# Altium PCB PCBAquario.PcbDoc
Units mm, origin at the board's own origin, x right, y up, seen from the top; angles counter-clockwise.
Board outline 158.78 x 73.08 mm, 2 copper layers (Top Layer, Bottom Layer); 68 components, 60 nets, 234 pads, 24 vias.
Unrouted connection lines stored in the file: 149.
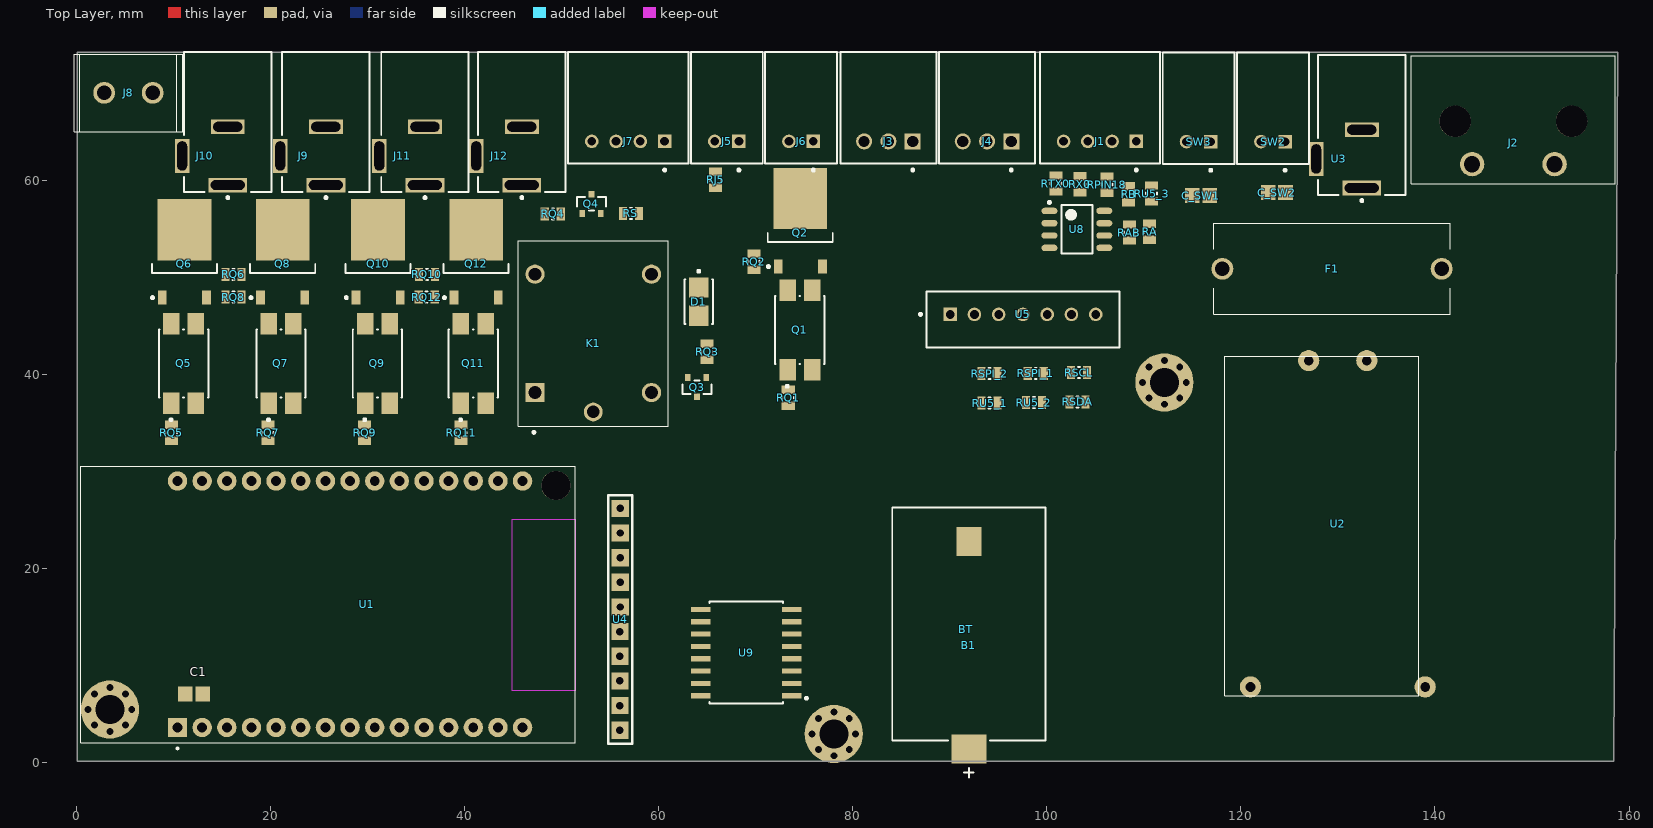
[diagram p0: Top Layer view]
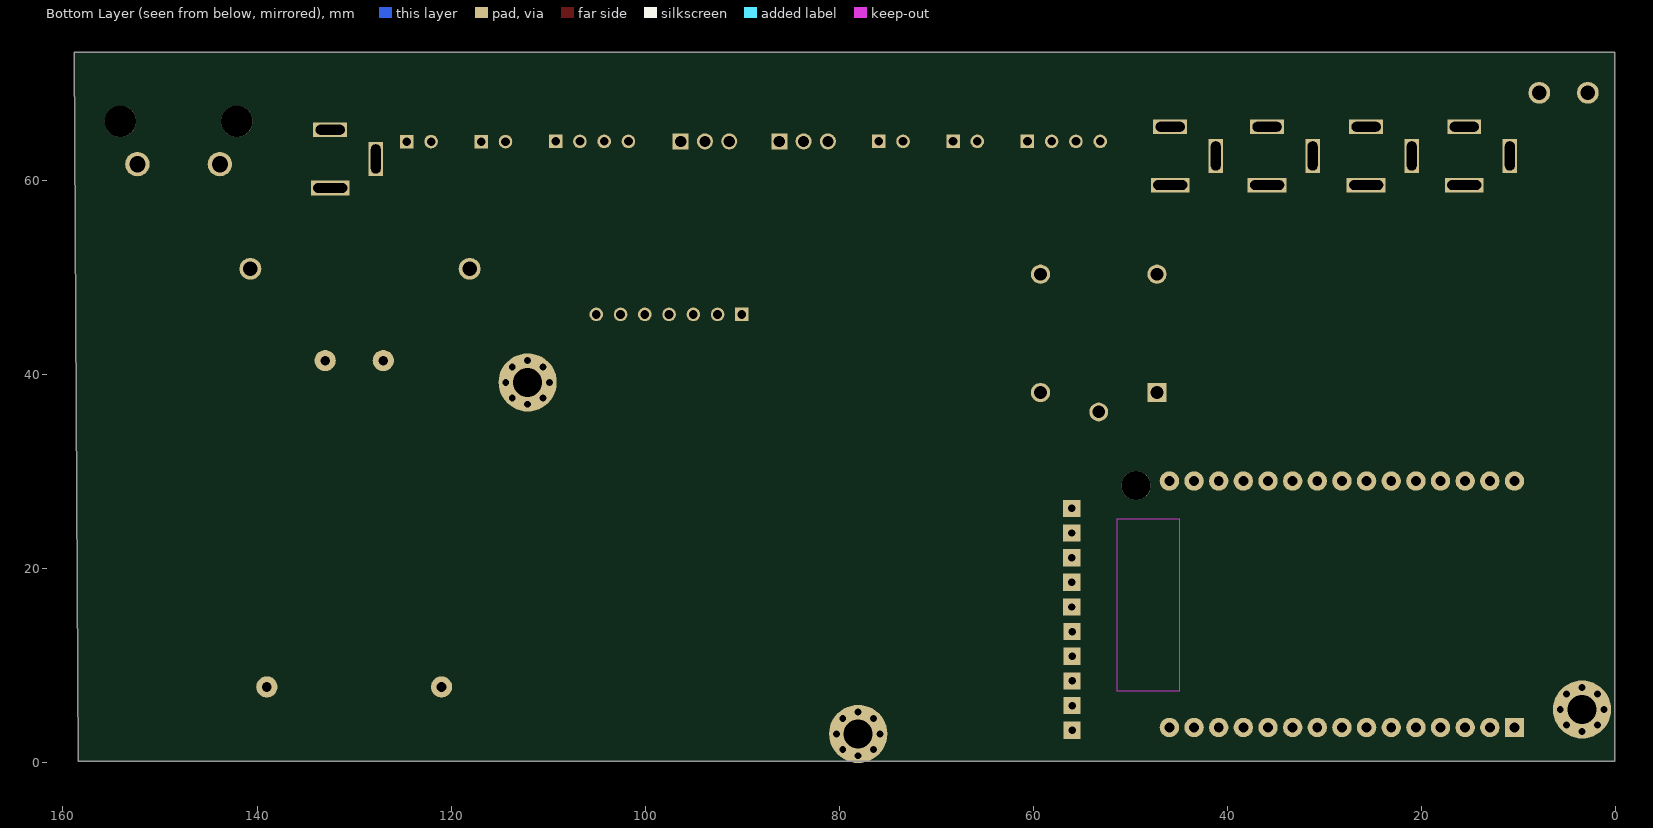
[diagram p1: Bottom Layer view, seen from below]

## Layer stack, top to bottom
Top Solder: solder mask 0.0102, Solder Resist, Dk 3.5
Top Layer: signal copper 0.0356
Dielectric 1: dielectric 0.32, FR-4, Dk 4.8
Bottom Layer: signal copper 0.0356
Bottom Solder: solder mask 0.0102, Solder Resist, Dk 3.5

## Board outline
0.076,0.102 0.076,73.177 158.854,73.177 158.401,0.102

## Design rules (kind name [scope] priority, off if disabled: settings)
Clearance [All] p1: gap=0.254 ignorepadtopadclearanceinfootprint=FALSE
PolygonConnect [All] p1: connectstyle=Relief reliefconductorwidth=0.254 reliefentries=4 polygonreliefangle="90 Angle" airgapwidth=0.254
RoutingVias [All] p1: holewidth=0.711 width=1.27 viastyle="Through Hole" minholewidth=0.711 minwidth=1.27 maxholewidth=0.711 maxwidth=1.27
SolderMaskExpansion [All] p1: expansion=0.102 istentingtop=FALSE
Width [All] p1: maxlimit=1.016 minlimit=0.254 preferedwidth=0.762
30 further rules are at their usual default settings.

## Components (designator, comment, footprint, x,y, rotation, side; value= is the part's Value field where it differs from the comment)
B1 "S8421-45R" FP-S8421-45R-MFG 91.973,14.249 r0 top
BT "CR2032" FP-CR2032-MFG 91.719,13.716 r90 top
C1 "10uF/16V" CAPC2013X145X50ML20T25 12.116,7.036 r180 top
C_SW1 "Capacitor 1 uF +/- 10% 25 V 0805" CAPC2013X145X50ML20T25 115.875,58.395 r0 top value=1µF
C_SW2 "Capacitor 1 uF +/- 10% 25 V 0805" CAPC2013X145X50ML20T25 123.698,58.699 r0 top value=1µF
D1 "1N4007 SMD" FP-1N4007_SMD-IPC_C 64.135,47.473 r270 top
F1 "0PTF0078P" 0PTF0078P 129.391,50.851 r0 top
J1 "S4B-XH-A(LF)(SN)" JST-S4B-XH-A(LF)(SN)_V 105.477,63.983 r180 top
J2 "RAPC322X" SWITCHCRAFT_RAPC322X 148.076,66.04 r180 top
J3 "S3B-XH-A(LF)(SN)" JST-S3B-XH-A(LF)(SN)_V 83.678,63.983 r180 top
J4 "S3B-XH-A(LF)(SN)" JST-S3B-XH-A(LF)(SN)_V 93.838,63.983 r180 top
J5 "S2B-XH-A(LF)(SN)" JST-S2B-XH-A(LF)(SN)_V 67.025,63.983 r180 top
J6 "S2B-XH-A(LF)(SN)" JST-S2B-XH-A(LF)(SN)_V 74.681,63.983 r180 top
J7 "S4B-XH-A(LF)(SN)" JST-S4B-XH-A(LF)(SN)_V 56.861,63.983 r180 top
J8 "CON2POS" CON2POS-Footprint-1 5.359,68.732 r180 top
J9 "PJ-002A" CUI-PJ-002A_V 25.705,62.484 r90 top
J10 "PJ-002A" CUI-PJ-002A_V 15.596,62.484 r90 top
J11 "PJ-002A" CUI-PJ-002A_V 35.916,62.484 r90 top
J12 "PJ-002A" CUI-PJ-002A_V 45.898,62.484 r90 top
K1 "SRD-05VDC-SL-C" RELAY_SRD-05VDC-SL-C 53.264,44.196 r90 top
Q1 "PC817X4NIP0F" FP-PC817X4NIP0F-MFG 74.549,44.552 r90 top
Q2 "ME15N10" INF-PG-TO252-3-1_L 74.594,55.779 r90 top
Q3 "BC817-40,215" FP-SOT23-MFG 63.957,38.659 r270 top
Q4 "BC817" FP-SOT23-MFG 53.076,57.54 r90 top
Q5 "PC817X4NIP0F" FP-PC817X4NIP0F-MFG 11.049,41.097 r90 top
Q6 "ME15N10" INF-PG-TO252-3-1_L 11.125,52.578 r90 top
Q7 "PC817X4NIP0F" FP-PC817X4NIP0F-MFG 21.082,41.097 r90 top
Q8 "ME15N10" INF-PG-TO252-3-1_L 21.26,52.578 r90 top
Q9 "PC817X4NIP0F" FP-PC817X4NIP0F-MFG 31.013,41.097 r90 top
Q10 "ME15N10" INF-PG-TO252-3-1_L 31.09,52.578 r90 top
Q11 "PC817X4NIP0F" FP-PC817X4NIP0F-MFG 40.894,41.097 r90 top
Q12 "ME15N10" INF-PG-TO252-3-1_L 41.199,52.578 r90 top
RA "20k" RESC2013X50X30LL20T20 110.592,54.661 r90 top
RAB "120" RESC2013X50X30LL20T20 108.509,54.585 r270 top
RB "20k" RESC2013X50X30LL20T20 108.433,58.522 r270 top
RJ5 "10k" RESC2013X50X30LL20T20 65.862,60.02 r90 top
RPIN18 "10k" RESC2013X50X30LL20T20 106.197,59.525 r90 top
RQ1 "100" RESC2013X50X30LL20T20 73.355,37.567 r270 top
RQ2 "100k" RESC2013X50X30LL20T20 69.825,51.587 r270 top
RQ3 "100" RESC2013X50X30LL20T20 64.999,42.291 r90 top
RQ4 "100" RESC2013X50X30LL20T20 49.098,56.515 r180 top
RQ5 "100" RESC2013X50X30LL20T20 9.779,33.96 r270 top
RQ6 "100k" RESC2013X50X30LL20T20 16.18,50.267 r180 top
RQ7 "100" RESC2013X50X30LL20T20 19.736,33.96 r270 top
RQ8 "100k" RESC2013X50X30LL20T20 16.18,47.93 r0 top
RQ9 "100" RESC2013X50X30LL20T20 29.693,33.96 r270 top
RQ10 "100k" RESC2013X50X30LL20T20 36.119,50.267 r180 top
RQ11 "100" RESC2013X50X30LL20T20 39.649,33.96 r270 top
RQ12 "100k" RESC2013X50X30LL20T20 36.093,47.93 r0 top
RS "10k" RESC2013X50X30LL20T20 57.15,56.566 r180 top
RSCL "10k" RESC2013X50X30LL20T20 103.327,40.157 r180 top
RSDA "10k" RESC2013X50X30LL20T20 103.175,37.135 r0 top
RSPI_1 "0" RESC2013X50X30LL20T20 98.857,40.081 r180 top
RSPI_2 "0" RESC2013X50X30LL20T20 94.107,40.056 r180 top
RTX0 "10k" RESC2013X50X30LL20T20 100.94,59.639 r90 top
RU5_1 "0" RESC2013X50X30LL20T20 94.107,37.008 r0 top
RU5_2 "0" RESC2013X50X30LL20T20 98.679,37.059 r0 top
RU5_3 "10k" RESC2013X50X30LL20T20 110.795,58.61 r270 top
RX0 "10k" RESC2013X50X30LL20T20 103.403,59.563 r90 top
SW2 "S2B-XH-A(LF)(SN)" JST-S2B-XH-A(LF)(SN)_V 123.312,63.957 r180 top
SW3 "S2B-XH-A(LF)(SN)" JST-S2B-XH-A(LF)(SN)_V 115.646,63.957 r180 top
U1 "ESP32-DEVKIT-V1" MODULE_ESP32_DEVKIT_V1 25.933,16.281 r90 top
U2 "HLK-5VFonte" HLK-5VFonte-Footprint-1 128.27,23.622 r270 top
U3 "PJ-002A" CUI-PJ-002A_V 132.461,62.176 r90 top
U4 "ADS1115" CON10 56.032,8.232 r90 top
U5 "Display" FP-B7B-XH-A_LF_SN-MFG 97.54,45.627 r180 top
U8 "MAX485CSA+" MAXM-MAX485CSA+-8_M 103.099,54.915 r0 top
U9 "DS3231SN#T&R" FP-W16-H2-MFG 69.023,11.303 r180 top

## Footprints (in the part's own frame and the unit in brackets; to place one, negate y for a bottom-side part, rotate by r counter-clockwise, add the part's x,y. Pads: shape width x height; smd on the part's side, far side on the other; paste and mask are expansions set on the pad)
0PTF0078P [mm]
  round 2.25 hole 1.5: 1(-11.3,0) 2(11.3,0)
  silkscreen extent -12.2,-4.7 12.2,4.7, body extent -12.2,-4.7 12.2,4.7, height 11.45
CAPC2013X145X50ML20T25 [mm] "Chip Capacitor, 2-Leads, Body 2.2x1.45mm, IPC Low Density"
  rect 1.5x1.55 smd: 1(-0.9,0) 2(0.9,0)
  body extent -1.1,-0.72 1.1,0.73, height 1.45
CON2POS-Footprint-1 [mm]
  round 2.25 hole 1.5: 1(-2.5,-0.254) 2(2.5,-0.254)
  silkscreen extent -5.6,-4.25 5.6,3.75, body extent -5.47,-4.19 5.73,3.81, height 11.16
CON10 [mil]
  rect 70x70 hole 30: 1(-194.09,0.98) 2(-94.09,0.98) 3(5.91,0.98) 4(105.91,0.98) 5(205.91,0.98) 6(305.91,0) 7(405.91,0) 8(505.91,0) 9(605.91,0) 10(705.91,0)
  silkscreen extent -249,-48 760,48, body extent -244,-47 749,46, height 519
CUI-PJ-002A_V [mm] "THD, 3-Leads, Body 14.4x9mm, Height 11mm"
  rect 1.5x4 hole 1 slot 3.5 at 90 deg: 1(-3,0)
  rect 1.5x3.5 hole 1 slot 3 at 90 deg: 2(3,0)
  rect 3.5x1.5 hole 1 slot 3 at 0 deg: 3(0,4.7)
  silkscreen extent -4.42,-4.5 10.7,4.5, body extent -3.7,-4.5 10.7,4.9, height 11
FP-1N4007_SMD-IPC_C [mm]
  rect 2.1x2 smd paste+0 mask+0: 1(-1.45,0) 2(1.45,0)
  silkscreen extent -3.25,-1.45 2.3,1.45, body extent -2.52,-1.35 2.52,1.35, height 2.62
FP-B7B-XH-A_LF_SN-MFG [mm]
  rect 1.4x1.4 hole 0.9 paste-1000 mask+0: 1(7.5,-0.525)
  round 1.4 hole 0.9 paste-1000 mask+0: 2(5,-0.525) 3(2.5,-0.525) 4(0,-0.525) 5(-2.5,-0.525) 6(-5,-0.525) 7(-7.5,-0.525)
  silkscreen extent -9.95,-2.88 10.67,2.87, body extent -10.05,-2.98 10.05,2.98, height 0.25
FP-CR2032-MFG [mm]
  body extent -10,-10 10,10, height 7.48
FP-PC817X4NIP0F-MFG [mm]
  rect 2.2x1.7 smd paste+0 mask+0: 1(-4.1,1.27) 2(-4.1,-1.27) 3(4.1,-1.27) 4(4.1,1.27)
  silkscreen extent -5.92,-2.54 3.5,2.54, body extent -5.3,-2.64 5.3,2.64, height 0.25
FP-S8421-45R-MFG [mm]
  rect 2.6x3 smd paste+0 mask+0: 1(0,8.5)
  rect 3.6x3 smd paste+0 mask+0: 2(0,-12.9)
  silkscreen extent -7.9,-15.83 7.9,11.99, body extent -8,-14.5 8,12.09, height 0.25
FP-SOT23-MFG [mm]
  rect 0.7x0.6 smd paste-1000 mask+0: 1(-1,0.95) 2(-1,-0.95) 3(1,0)
  silkscreen extent -0.7,-1.5 0.7,1.5, body extent -1.2,-1.45 1.2,1.45, height 1.1
FP-W16-H2-MFG [mm]
  rect 1.98x0.53 smd paste+0 mask+0: 1(-4.685,4.445) 2(-4.685,3.175) 3(-4.685,1.905) 4(-4.685,0.635) 5(-4.685,-0.635) 6(-4.685,-1.905) 7(-4.685,-3.175) 8(-4.685,-4.445) 9(4.685,-4.445) 10(4.685,-3.175) 11(4.685,-1.905) 12(4.685,-0.635) 13(4.685,0.635) 14(4.685,1.905) 15(4.685,3.175) 16(4.685,4.445)
  silkscreen extent -6.33,-5.25 3.8,5.25, body extent -3.8,-5.25 3.8,5.25, height 2.65
HLK-5VFonte-Footprint-1 [mil]
  round 86 hole 39.37: L(-699.44,185.35) N(-699.44,-50.35) V+(624.5,-286.57) V-(624.5,422.09)
  silkscreen extent -717,-392 661,396, body extent -705,-346 633,450, height 197
INF-PG-TO252-3-1_L [mm] "DPAK, 3-Leads, Body 6.525x6.12mm, Pitch 2.28mm, IPC High Density"
  rect 1.45x0.9 smd: 1(-4.7,2.28) 3(-4.7,-2.28)
  rect 6.3x5.55 smd: 2(2.3,0)
  silkscreen extent -4.82,-3.35 -1.25,3.4, body extent -2.15,-3.32 4.07,3.32, height 2.35
JST-S2B-XH-A(LF)(SN)_V [mm] "Header, 2-Leads, Body 7.4x11.5mm, Pitch 2.5mm"
  rect 1.4x1.4 hole 0.9: 1(-1.25,0)
  round 1.4 hole 0.9: 2(1.25,0)
  silkscreen extent -3.7,-9.2 3.7,3.08, body extent -3.7,-9.2 3.7,2.3, height 5.95
JST-S3B-XH-A(LF)(SN)_V [mm] "Header, 3-Leads, Body 9.9x11.5mm, Pitch 2.5mm"
  rect 1.65x1.65 hole 1.15: 1(-2.5,0)
  round 1.65 hole 1.15: 2(0,0) 3(2.5,0)
  silkscreen extent -4.95,-9.2 4.95,3.08, body extent -4.95,-9.2 4.95,2.3, height 6.15
JST-S4B-XH-A(LF)(SN)_V [mm] "Header, 4-Leads, Body 12.4x11.5mm, Pitch 2.5mm"
  rect 1.4x1.4 hole 0.9: 1(-3.75,0)
  round 1.4 hole 0.9: 2(-1.25,0) 3(1.25,0) 4(3.75,0)
  silkscreen extent -6.2,-9.2 6.2,3.08, body extent -6.2,-9.2 6.2,2.3, height 6.15
MAXM-MAX485CSA+-8_M [mm] "SOIC, 8-Leads, Body 5x4mm, Pitch 1.27mm, IPC Low Density"
  oval 1.65x0.65 smd: 1(-2.825,1.905) 2(-2.825,0.635) 3(-2.825,-0.635) 4(-2.825,-1.905) 5(2.825,-1.905) 6(2.825,-0.635) 7(2.825,0.635) 8(2.825,1.905)
  silkscreen extent -2.95,-2.5 1.6,2.9, body extent -2,-2.5 2,2.5, height 1.75
MODULE_ESP32_DEVKIT_V1 [mm]
  rect 2x2 hole 1.02: 1(-12.7,15.515)
  round 2 hole 1.02: 2(-12.7,12.975) 3(-12.7,10.435) 4(-12.7,7.895) 5(-12.7,5.355) 6(-12.7,2.815) 7(-12.7,0.275) 8(-12.7,-2.265) 9(-12.7,-4.805) 10(-12.7,-7.345) 11(-12.7,-9.885) 12(-12.7,-12.425) 13(-12.7,-14.965) 14(-12.7,-17.505) 15(-12.7,-20.045) 16(12.7,-20.045) 17(12.7,-17.505) 18(12.7,-14.965) 19(12.7,-12.425) 20(12.7,-9.885) 21(12.7,-7.345) 22(12.7,-4.805) 23(12.7,-2.265) 24(12.7,0.275) 25(12.7,2.815) 26(12.7,5.355) 27(12.7,7.895) 28(12.7,10.435) 29(12.7,12.975) 30(12.7,15.515)
  round 3 hole 3 unplated: ""(12.23,-23.475)
  Keep-Out Layer region: 8.78,-25.475 -8.91,-25.475 -8.91,-18.985 8.78,-18.985
  Keep-Out Layer region: 8.78,-25.475 -8.91,-25.475 -8.91,-18.985 8.78,-18.985
  silkscreen extent -14.95,-25.47 14.23,25.47, body extent -14.22,-25.53 14.28,25.4, height 7.16
RELAY_SRD-05VDC-SL-C [mm]
  rect 1.98x1.98 / inner round 1.98 / far side rect 1.98x1.98 hole 1.32: A1(-6.1,6)
  round 1.98 hole 1.32: A2(-6.1,-6) NC(6.1,6) NO(6.1,-6)
  round 1.935 hole 1.29: COM(-8.1,0)
  silkscreen extent -10.3,-7.75 9.55,7.75, body extent -9.6,-7.8 9.6,7.8, height 15.8
RESC2013X50X30LL20T20 [mm] "Chip Resistor, 2-Leads, Body 2.00x1.25mm, IPC High Density"
  rect 0.85x1.35 smd: 1(-0.825,0) 2(0.825,0)
  silkscreen extent -0.1,-0.58 0.1,0.58, body extent -1.1,-0.72 1.1,0.72, height 0.5
SWITCHCRAFT_RAPC322X [mm]
  round 2.52 hole 1.68: L(-4.25,4.4) N(4.25,4.4)
  round 3.25 hole 3.25 unplated mask+0.254: ""(-6,0) ""(6,0)
  silkscreen extent -10.5,-6.75 10.5,6.4, body extent -10.47,-8.27 10.53,6.38, height 12.95

## Part data
B1: library part CMP-2000-07028-3, "BATTERY HOLDER COIN 20MM SMD", Case/Package=SMD/SMT, Max Operating Temperature=105°C, Min Operating Temperature=-40°C, Package Quantity=500, Contact Plating=Bronze, Material=Polyphenylene, Mount="Surface Mount", Number of Batteries=1, Number of Cells=1, Packaging="Tape and Reel", REACH SVHC="No SVHC", Termination=SMD/SMT
BT: library part CMP-05417-000003-1, "BATTERY LITHIUM 3V COIN 20MM", Manufacturer=Panasonic, Temperature="-30°C to +60°C", Temperature Range High=+60°C, Temperature Range Low=-30°C, Automotive=No, Category=Batt, ComponentLink2Description=Datasheet, ComponentLink2URL=https://upverter.com/datasheet/5ee6469450a36cf26ddc1e0271adf06b3d83bec7.pdf, Device Class L1="Passive Components", Device Class L2=unset, Device Class L3=unset, Height=3.2mm, Manufacturer Part Number=CR2032, Mouser Description="Battery; Lithium High Energy; 3 VoltS; 230 MAH; Coin Cell", Octopart=https://octopart.com/cr2032-panasonic-39385932, Package=CR2032
C1 C_SW1 C_SW2: library part CMP-001-00010-6, "Chip Capacitor, 1 uF, +/-10%, 25 V, 0805 (2012 Metric)", Capacitor Type=Ceramic, Case/Package=0805, Max Operating Temperature=125°C, Min Operating Temperature=-55°C, Tolerance=10%, Voltage Rating=25V, Mounting Technology=SM, Pins=2, RoHS Compliant=True
D1: library part CMP-12389-000001-1, "Rectifier, 1Kv, 1A, Do-214Ac Rohs Compliant: Yes"
F1: "Undefined or Miscellaneous", Manufacturer_Name=LITTELFUSE, Mouser Part Number=576-0PTF0078P, Arrow Part Number=0PTF0078P, Arrow Price/Stock=null?region=nac, Datasheet Link=https://media.digikey.com/pdf/Data%20Sheets/Littelfuse%20PDFs/PTF075_77_78.pdf, Height=11.5mm, Manufacturer_Part_Number=0PTF0078P, Mouser Price/Stock=https://www.mouser.co.uk/ProductDetail/Littelfuse/0PTF0078P?qs=Co4VkB5J4%2Fsczy6gG8s%2FsA%3D%3D
J1 J7: library part CMP-002-00034-2, "Male Header, Pitch 2.5 mm, 1 x 4 Position, Height 6.1 mm, Tail Length 3.4 mm, -25 to 85 degC, RoHS, Bulk", Manufacturer=JST, Max Operating Temperature=85°C, Min Operating Temperature=-25°C, Package Description="XH Series Disconnectable Crimp Style Connector, Pitch 2.5 mm, 1 x 4 Position, Height 6.1 mm, Tail Length 3.4 mm", Case/Package=S4B-XH-A(LF)(SN), Connector Type=Header, Datasheet URL=http://www.jst-mfg.com/product/pdf/eng/eXH.pdf, Datasheet Version=May-16, Gender=Male, Manufacturer URL=http://www.jst.com/home2.html, Mounting Technology=TH, Package Reference=S4B-XH-A(LF)(SN), RoHS Compliant=Unknown
J2: "Power Entry Connector Receptacle, Male Pins IEC 320-C8, Non-Polarized Panel Mount, Snap-In; Through Hole, Right Angle", Package=None, Availability="In Stock", Check_prices=https://www.snapeda.com/parts/RAPC322X/Switchcraft+Inc./view-part/?ref=eda, MF="Switchcraft Inc.", MP=RAPC322X, Price=None, Purchase-URL=https://pricing.snapeda.com/search/part/RAPC322X/?ref=eda, SnapEDA_Link=https://www.snapeda.com/parts/RAPC322X/Switchcraft+Inc./view-part/?ref=snap
J3 J4: library part CMP-002-00033-2, "Male Header, Pitch 2.5 mm, 1 x 3 Position, Height 6.1 mm, Tail Length 3.4 mm, -25 to 85 degC, RoHS, Bulk", Manufacturer=JST, Max Operating Temperature=85°C, Min Operating Temperature=-25°C, Package Description="Male Header, Pitch 2.5 mm, 1 x 3 Position, Height 6.1 mm, Tail Length 3.4 mm", Case/Package=S3B-XH-A(LF)(SN), Connector Type=Header, Datasheet URL=http://www.jst-mfg.com/product/pdf/eng/eXH.pdf, Datasheet Version=May-16, Gender=Male, Manufacturer URL=http://www.jst.com/home2.html, Mounting Technology=TH, Package Reference=S3B-XH-A(LF)(SN), RoHS Compliant=Unknown
J5 J6 SW2 SW3: library part CMP-002-00032-2, "Male Header, Pitch 2.5 mm, 1 x 2 Position, Height 6.1 mm, Tail Length 3.4 mm, -25 to 85 degC, RoHS, Bulk", Manufacturer=JST, Max Operating Temperature=85°C, Min Operating Temperature=-25°C, Package Description="XH Series Disconnectable Crimp Style Connector, Pitch 2.5 mm, 1 x 2 Position, Height 6.1 mm, Tail Length 3.4 mm", Case/Package=S2B-XH-A(LF)(SN), Connector Type=Header, Datasheet URL=http://www.jst-mfg.com/product/pdf/eng/eXH.pdf, Datasheet Version=May-16, Gender=Male, Manufacturer URL=http://www.jst.com/home2.html, Mounting Technology=TH, Package Reference=S2B-XH-A(LF)(SN), RoHS Compliant=Unknown
J8: library part CMP-002-00071-1, "Conector Borne"
J9 J10 J11 J12 U3: library part CMP-2000-06895-2, "Through Hole Right Angle DC Power Jack, 2.5 A, 2 mm Center Pin, 3 Position, -25 to 85 degC, RoHS, Bulk", Current Rating=2.5A, Flammability Rating=UL94V-0, Insulation Resistance=50MOhms, Manufacturer=CUIInc., Operating Temperature Range=-25Cto+85C, Package Description="3-Pin Through Hole Device, Body 14.4 x 9 mm, Height 11 mm", Voltage Rating=24V, Brand=CUI, Connector Type=DCPowerJack, Contact Gender=Male, Contact Material=Copper, Contact Plating=Nickel, Datasheet URL=http://www.cui.com/product/resource/pj-002a.pdf, Datasheet Version="Rev. 1.03, 04/2016", Factory Pack Quantity=500, Housing Material=PolybutyleneTerephthalate(PBT), Inside Contact Diameter=2mm, Manufacturer URL=http://www.cui.com/, Mounting Angle=Right, Mounting Style=ThroughHole, Mounting Technology=ThroughHole, Outside Contact Diameter=6.5mm, Package Reference=PJ-002A, Product=Jacks, Product Category=DCPowerConnectors, RoHS=True, Termination Style=ThroughHole
K1: "5V Trigger Relay Module For Arduino And Raspberry Pi 5V Trigger Relay Module For Arduino And Raspberry Pi", Package="NON STANDARD-5 Songle Relay", Availability="Not in stock", Check_prices=https://www.snapeda.com/parts/SRD-05VDC-SL-C/Songle+Relay/view-part/?ref=eda, MF="Songle Relay", MP=SRD-05VDC-SL-C, Price=None, SnapEDA_Link=https://www.snapeda.com/parts/SRD-05VDC-SL-C/Songle+Relay/view-part/?ref=snap
Q1 Q5 Q7 Q9 Q11: library part CMP-65434-000001-1, "OPTOISOLATOR 5KV TRANS 4SMD", Collector Emitter Voltage=80V, Emiiter Collector Voltage=6V, Forward Current=20mA, Forward Voltage=1.2V, Isolation Voltage=5kVrms, Manufacturer=Sharp, Max Current Transfer Ratio=600%, Min Current Transfer Ratio=50%, Power Dissipation=200mW, Temperature="-30°C to +100°C", Temperature Range High=+100°C, Temperature Range Low=-30°C, Automotive=No, Category=Trans, ComponentLink2Description=Datasheet, ComponentLink2URL=https://www.sharpsde.com/fileadmin/products/Optoelectronics/Isolation%20Devices/Specs%20Photocoupler/PC817XxNIP0F_17Jun08_Spec_ED-04P129A.pdf, Device Class L1=Optoelectronics, Device Class L2=Optocouplers, Device Class L3=unset, Digikey Description="OPTOISOLATOR 5KV TRANS 4SMD", Height=4.6mm, Lead Free=Yes, Manufacturer Part Number=PC817X4NIP0F, Mouser Description="Transistor Output Optocouplers Photocoupler 300-600% CRT", Octopart=https://octopart.com/pc817x4nip0f-sharp-20650453, Package=PC817X4NIP0F, Reverse Voltage=6V, RoHS=TRUE, Standoff Height=0.1mm
Q2 Q6 Q8 Q10 Q12: library part CMP-1099-00054-1, "P-Channel OptiMOS P3 Power-Transistor, -30 V VDS, -70 A ID, -55 to 175 degC, PG-TO252-3-1, Reel, Green", Manufacturer=Infineon, PartNumber="IPD042P03L3 G", ComponentLink1Description="Manufacturer URL", ComponentLink1URL=http://www.infineon.com/, ComponentLink2Description=Datasheet, ComponentLink2URL=http://www.infineon.com/dgdl/IPD042P03L3+G_2+0.pdf?folderId=db3a304314dca38901154a72e3951a65&fileId=db3a30431d8a6b3c011d90c8c6e60425, ComponentLink3Description="Package Specification", ComponentLink3URL=http://www.infineon.com/dgdl/TLE42744_DS_11.pdf?folderId=db3a304318f3fe290118f5a433570040&fileId=db3a304327b897500128012ccafe37d2&sId=db3a30443d67b5ca013d83f7c0ea327b, DatasheetVersion="Rev. 2.0", Green=TRUE, ID (max)="-70Â A", IDpuls (max)="-280Â A", Mounting Technology="Surface Mount", PackageDescription="3-Pin Plastic (Green) Transistor Single Outline Package, 6.5 x 6.12 mm Body, 2.28 mm Pitch", PackageReference=PG-TO252-3-1, PackageVersion=Jan-10, Packing=Reel, Pto t (max)="150Â W", QG="131Â nC", RDS (on) (max)="4.2Â mOhm", RDS (on) (max) (@4.5V)="6.8Â mOhm", Rth="1Â K/W", RthJC (max)="1Â K/W", VDS (max)="-30Â V", VGS(th) (max)="-1Â V", VGS(th) (min)="-2Â V"
Q3: library part CMP-14406-000007-1, "TRANS NPN 45V 0.5A SOT23", Ambient Temperature Range High=+150°C, Ambient Temperature Range Low=-65°C, Collector Base Voltage=50V, Collector Emitter Breakdown Voltage=45V, Collector Emitter Saturation Voltage=700mV, Emitter Base Voltage=5V, Manufacturer=Nexperia, Max Collector Current=500mA, Package=SOT23, Power Dissipation=250mW, Temperature="to +150°C", Unity Gain Freq=100MHz, Automotive=Yes, Automotive Grade="Grade 0", Category=Trans, Collector Emitter Voltage=45V, ComponentLink2Description=Datasheet, ComponentLink2URL=https://assets.nexperia.com/documents/data-sheet/BC817_SER.pdf, Device Class L1="Discrete Semiconductors", Device Class L2=Transistors, Device Class L3=BJTs, Digikey Description="TRANS NPN 45V 0.5A SOT23", Footprint Url=https://assets.nexperia.com/documents/outline-drawing/SOT23.pdf, Height=1.1mm, Hfe Max=600, Hfe Min=250, Hfe Testic=100mA, Hfe Testvce=1V, Ipc Land Pattern Name=SOT95P230X100-3, Lead Free=Yes, Manufacturer Part Number=BC817-40,215, Max Junction Temp=+150°C, Mouser Description="BC817 Series 45 V 500 mA 250 mW SMT NPN General-Purpose Transistor - SOT-23-", Number Of Elements=1, Number Of Npn=1, Octopart=https://octopart.com/bc817-40%2C215-nexperia-78739081, RoHS=TRUE, Rthja Max=500K/W, Temperature Range High=+150°C
Q4: library part CMP-14406-000007-1, "TRANS NPN 45V 0.5A SOT23", Ambient Temperature Range High=+150°C, Ambient Temperature Range Low=-65°C, Collector Base Voltage=50V, Collector Emitter Breakdown Voltage=45V, Collector Emitter Saturation Voltage=700mV, Emitter Base Voltage=5V, Manufacturer=Nexperia, Manufacturer Part Number=BC817-40,215, Max Collector Current=500mA, Package=SOT23, Power Dissipation=250mW, Temperature="to +150°C", Unity Gain Freq=100MHz, Automotive=Yes, Automotive Grade="Grade 0", Category=Trans, Collector Emitter Voltage=45V, ComponentLink2Description=Datasheet, ComponentLink2URL=https://assets.nexperia.com/documents/data-sheet/BC817_SER.pdf, Device Class L1="Discrete Semiconductors", Device Class L2=Transistors, Device Class L3=BJTs, Digikey Description="TRANS NPN 45V 0.5A SOT23", Footprint Url=https://assets.nexperia.com/documents/outline-drawing/SOT23.pdf, Height=1.1mm, Hfe Max=600, Hfe Min=250, Hfe Testic=100mA, Hfe Testvce=1V, Ipc Land Pattern Name=SOT95P230X100-3, Lead Free=Yes, Max Junction Temp=+150°C, Mouser Description="BC817 Series 45 V 500 mA 250 mW SMT NPN General-Purpose Transistor - SOT-23-", Number Of Elements=1, Number Of Npn=1, Octopart=https://octopart.com/bc817-40%2C215-nexperia-78739081, RoHS=TRUE, Rthja Max=500K/W, Temperature Range High=+150°C
RA RAB RB RJ5 RPIN18 RQ1 RQ2 RQ3 RQ4 RQ5 RQ6 RQ7 RQ8 RQ9 RQ10 RQ11 RQ12 RS RSCL RSDA RSPI_1 RSPI_2 RTX0 RU5_1 RU5_2 RU5_3 RX0: library part CMP-2001-04896-1, Manufacturer="Vishay Dale", Part Number=CRCW08050000Z0EA
U1: "Dual core, Wi-Fi: 2.4 GHz up to 150 Mbits/s,BLE (Bluetooth Low Energy) and legacy Bluetooth, 32 bits, Up to 240 MHz", Package=None, Availability=Unavailable, MP=ESP32-DEVKIT-V1, Price=None
U2: library part CMP-001-0001-1
U4: library part CONECTOR_10PIN
U5: library part CMP-17439-000323-2, "CONN HEADER VERT 7POS 2.5MM", Color=Natural, Contact Resistance=20mR, Current Rating=3A, Flammability Rating="UL94 V-0", Housing Color=White, Insulation Resistance=1GR, Max Operating Temperature=85°C, Max Voltage Rating (AC)=250V, Min Operating Temperature=-25°C, Connector Type=Header, Contact Finish - Mating=TIN, Contact Material=Brass, Contact Plating=Tin, Contact Shape=Square, Contact Type="Male Pin", Depth=5.75mm, Fastening Type=Detent, Housing Material=Polyamide, Insulation Color=Natural, Insulation Material=Nylon, Lead Free="Lead Free", Lead Pitch=2.5mm, Length=19.9mm, Mated Stacking Heights=9.8mm, Max Current Rating=3A, Mount="Through Hole", Number of Contacts=7, Number of Positions=7, Number of Rows=1, Orientation=Straight, Packaging=Bulk, Pitch=2.5mm, REACH SVHC="No SVHC", Series=XH, Termination=Solder, Voltage Rating=250V, Voltage Rating (AC)=250V, Wire/Cable Gauge=22AWG
U8: library part CMP-2000-05211-1, "Low-Power, Slew-Rate-Limited RS-485/RS-422 Transceiver, 4.75 to 5.25 V, 0 to 70 degC, 8-Pin SOIC, RoHS, Tape and Reel", Digital IC Case Style=SOIC, IC Temperature Range=Commercial, Manufacturer=Maxim, Operating Temperature Max=70degC, Operating Temperature Min=0degC, Operating Temperature Range=0degCto+70degC, Supply Current=500µA, Supply Voltage Max=5.25V, Supply Voltage Min=4.75V, Supply Voltage Range=4.75Vto5.25V, Base Number=485, Data Rate=2.5Mbps, Datasheet URL=https://datasheet.ciiva.com/29306/170071-da-01-en-ic-max485csa-so8-29306144.pdf, Datasheet Version="Rev. 8, 10/2003", Device Marking=MAX485CSA+, Device Type=Transceiver, Driver Case Style=SOIC, IC Generic Number=485, Interface=RS-422/RS-485, Interface Type=RS422,RS485, Line / Bus Driver / Receiver / Transceiver Type=CMOSDifferential, Logic Function Number=485, Manufacturer URL=http://www.maximintegrated.com/, No. of Drivers=1, No. of Pins=8, No. of Receivers=1, Package / Case=SOIC, Transceiver Type=Differential
U9: library part CMP-0254-00375-2, "IC RTC CLK/CALENDAR I2C 16-SOIC", Case/Package=SOIC, Max Operating Temperature=85°C, Max Supply Voltage=5.5V, Min Operating Temperature=-40°C, Min Supply Voltage=2.3V, Operating Supply Voltage=3.3V, Package Quantity=1000, Contact Plating=Tin, Date Format=YY-MM-DD-dd, Interface=I2C, Lead Free="Lead Free", Logic Function=Clock, Mount="Surface Mount", Number of Pins=16, Packaging="Tape and Reel", Radiation Hardening=No, Time Format=HH:MM:SS

## Free pads (board coordinates)
  round 6 hole 3: 2(3.454,5.436) 2(78.054,2.921) 2(112.116,39.141)

## Via types
v1: diameter 1.27, hole 0.711, Top Layer to Bottom Layer, 24 vias

## Nets (pads, with @x,y where several pads share a name; then routed paths per layer and width w, separated by ;. In a path a pad name is that pad's centre, name@x,y a point inside that pad or via, vN(x,y) a via of type N, cw(c..) or ccw(c..) an arc to the next point about the centre after c; other vN are vias at no path point)
+3V3: C1.2 J5.1 J7.1 RA.2 RPIN18.2 RSCL.1 RSDA.2 RTX0.2 RU5_3.2 RX0.2 U1.1 U4.10 U5.1 U8.8
+5: D1.1 J3.2 J4.2 K1.A1 U1.30 U2.V+
+12: J1.1 J6.1 J9.1 J10.1 J11.1 J12.1 RQ2.1 RQ6.1 RQ8.1 RQ10.1 RQ12.1 U3.1
A: J1.3 RA.1 RAB.2 U8.6
A1: J3.1 U4.3
A2: J4.1 U4.2
A3: U4.1
AGND: C1.1 C_SW1.1 C_SW2.1 J1.2 J3.3 J4.3 Q1.2 Q1.3 Q2.3 Q3.2 Q4.2 Q5.2 Q5.3 Q6.3 Q7.2 Q7.3 Q8.3 Q9.2 Q9.3 Q10.3 Q11.2 Q11.3 Q12.3 RB.1 RJ5.1 RS.2 SW2.2 SW3.2 U1.2 U1.29 U2.V- U3.2 U3.3 U4.9 U5.2 U8.5
Alimentador: RQ4.2 U1.27
Aquecedor: RQ3.2 U1.7
B: J1.4 RAB.1 RB.2 U8.7
B_Lampada: C_SW1.2 SW3.1
BAT-: B1.1 U9.13
Botao_DOWN: U1.4
Botao_UP: C_SW2.2 SW2.1 U1.3
CLK: RSPI_1.2 U1.9
CMD: U1.8 U5.5
Cooler: RQ5.2 U1.23
FitaLed: RQ1.2 U1.21
GND_Alimentador: J7.3 J7.4 Q4.3
GND_Cooler: J10.2 J10.3 Q6.2
GND_Fita: J6.2 Q2.2
GND_Lampada1: J9.2 J9.3 Q8.2
GND_Lampada2: J11.2 J11.3 Q10.2
GND_Lampada3: J12.2 J12.3 Q12.2
L: J2.L J8.1 U2.L
Lampada1: RQ7.2 U1.24
Lampada2: RQ9.2 U1.25
Lampada3: RQ11.2 U1.26
Led: U1.5
N: F1.2 J2.N K1.COM
N_Connector: J8.2 K1.NO
NetB1_2: B1.2 U9.2
NetD1_2: D1.2 K1.A2 Q3.3
NetF1_1: F1.1 U2.N
NetQ1_1: Q1.1 RQ1.1
NetQ1_4: Q1.4 Q2.1 RQ2.2
NetQ3_1: Q3.1 RQ3.1
NetQ4_1: Q4.1 RQ4.1
NetQ5_1: Q5.1 RQ5.1
NetQ5_4: Q5.4 Q6.1 RQ6.2
NetQ7_1: Q7.1 RQ7.1
NetQ7_4: Q7.4 Q8.1 RQ8.2
NetQ9_1: Q9.1 RQ9.1
NetQ9_4: Q9.4 Q10.1 RQ10.2
NetQ11_1: Q11.1 RQ11.1
NetQ11_4: Q11.4 Q12.1 RQ12.2
NetRSPI_1_1: RSPI_1.1 RU5_2.1 U5.4
NetRSPI_2_1: RSPI_2.1 RU5_1.1 U5.3
NetRU5_3_1: RU5_3.1 U5.7
NF_3: K1.NC
NTC_1: J5.2 RJ5.2 U4.4
PIN18: RPIN18.1 U1.6 U8.2 U8.3
RX0: RX0.1 U1.12 U8.1
S_Alimentador: J7.2 RS.1 U1.28
SCL_CLIENTE: RSCL.2 RU5_1.2 U1.14 U4.8 U9.16
SD0: RSPI_2.2 U1.10
SD1: U1.15 U5.6
SDA_CLIENTE: RSDA.1 RU5_2.2 U1.11 U4.6 U4.7 U9.15
TX0: RTX0.1 U1.13 U8.4
pads on no net: J2. U1. U1.16 U1.17 U1.18 U1.19 U1.20 U1.22 U4.5 U9.1 U9.3 U9.4 U9.5 U9.6 U9.7 U9.8 U9.9 U9.10 U9.11 U9.12 U9.14
copper on no net:
  other v1: 78.054,0.671 76.467,1.334 79.641,1.334 75.804,2.921 80.304,2.921 3.454,3.186 1.867,3.848 5.042,3.848 76.467,4.508 79.641,4.508 78.054,5.171 1.204,5.436 5.704,5.436 1.867,7.023 5.042,7.023 3.454,7.686 112.116,36.891 110.528,37.554 113.703,37.554 109.866,39.141 114.366,39.141 110.528,40.729 113.703,40.729 112.116,41.391

## Silkscreen, mask and mechanical layers (free items; w line width, h text height)
Mechanical 1:
  lines w0.203: 0.076,0.102 158.401,0.102 158.854,73.177 0.076,73.177 0.076,0.102
  lines w0.762: 118.478,5.56 141.478,5.56 141.478,43.56 ; 118.491,5.588 118.491,43.588 141.491,43.588

## Text inside footprints (layer, text, board x,y; h text height)
J2: Mechanical 13 "PCB EDGE" at 145.076,73.05 h0.81 r180
J8: Mechanical 13 "1" at 8.409,71.786 h1.27 r180